# Altium PCB Bento_Pad_Plus_PCB.PcbDoc (part 2 of 3)
Units mm, origin at the board's own origin, x right, y up, seen from the top; angles counter-clockwise.
Board outline 279.4 x 81.28 mm, 2 copper layers (Top Layer, Bottom Layer), stack 1.57 mm thick; 149 components, 65 nets, 541 pads, 199 vias.
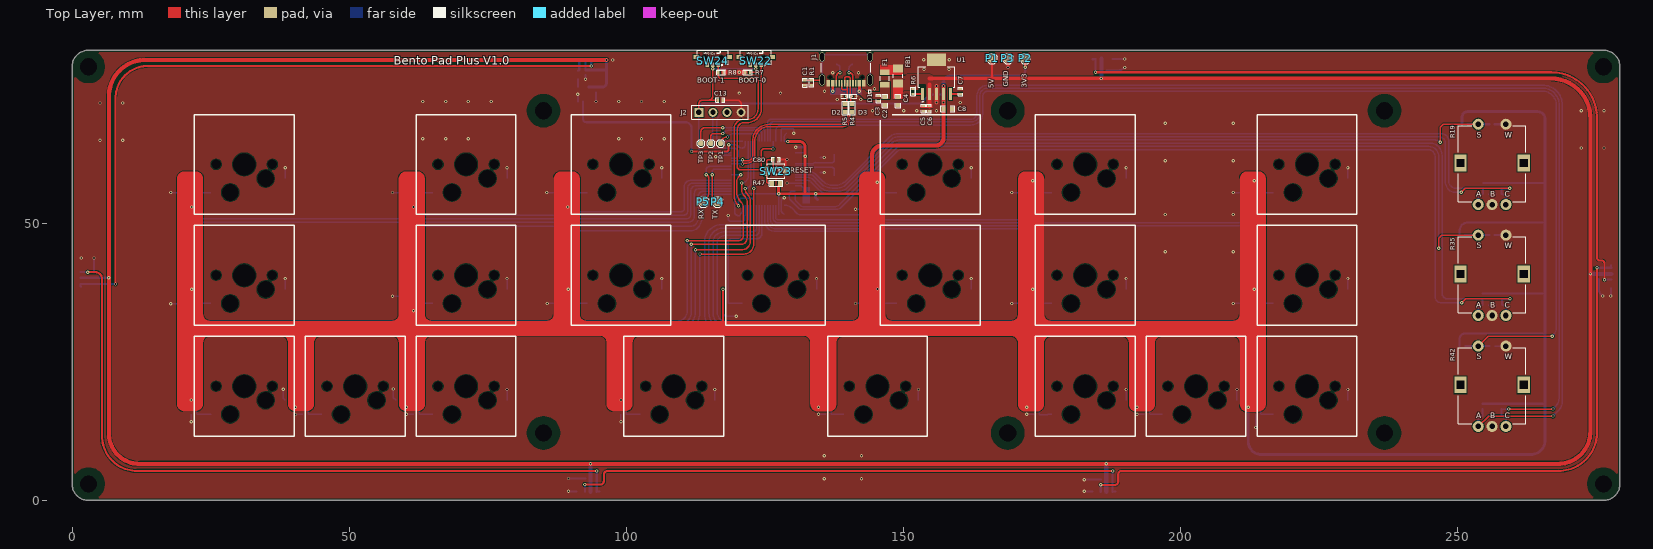
[diagram p0: Top Layer view]

## Part data (continued)
R2 R3: library part RC0402FR-075K1L, "RES 5.1K OHM 1% 1/16W 0402", Case Code (Imperial)=0402, Case Code (Metric)=1005, LCSC Part Number=C105872, Manufacturer=Yageo, Max Operating Temperature=155°C, Max Power Dissipation=63mW, Min Operating Temperature=-55°C, Package Quantity=1, Resistance=5.1kR, Resistance Tolerance=1%, Resistor Type="Thick Film", Temperature Coefficient=100ppm/°C, Voltage Rating=50V, Case/Package=0402, Category="Chip SMD Resistors", ComponentLink1Description=https://datasheet.ciiva.com/7983/1018594-7983519.pdf?src-supplier=Element14, ComponentLink1URL=https://datasheet.ciiva.com/7983/1018594-7983519.pdf?src-supplier=Element14, ComponentLink2Description=https://datasheet.ciiva.com/46394/1018594-46394936.pdf?src-supplier=Element14, ComponentLink2URL=https://datasheet.ciiva.com/46394/1018594-46394936.pdf?src-supplier=Element14, ComponentLink3Description=https://datasheet.ciiva.com/2453/pyu-r-int-thick-7-2453401.pdf?src-supplier=Digi-Key, ComponentLink3URL=https://datasheet.ciiva.com/2453/pyu-r-int-thick-7-2453401.pdf?src-supplier=Digi-Key, ComponentLink4Description=https://datasheet.ciiva.com/2453/pyu-r-int-thick-7-2453402.pdf?src-supplier=Digi-Key, ComponentLink4URL=https://datasheet.ciiva.com/2453/pyu-r-int-thick-7-2453402.pdf?src-supplier=Digi-Key, ComponentLink5Description=https://datasheet.ciiva.com/2453/pyu-r-int-thick-7-2453400.pdf?src-supplier=Digi-Key, ComponentLink5URL=https://datasheet.ciiva.com/2453/pyu-r-int-thick-7-2453400.pdf?src-supplier=Digi-Key, ComponentLink6Description=https://datasheet.ciiva.com/12558/pyu-rc0402-51-rohs-l-6-r-8721-12558460.pdf?src-supplier=Mouser, ComponentLink6URL=https://datasheet.ciiva.com/12558/pyu-rc0402-51-rohs-l-6-r-8721-12558460.pdf?src-supplier=Mouser, ComponentLink7Description=https://datasheet.ciiva.com/16744/pyu-rc0402-51-rohs-l-6-r-16744283.pdf?src-supplier=Future+Electronics, ComponentLink7URL=https://datasheet.ciiva.com/16744/pyu-rc0402-51-rohs-l-6-r-16744283.pdf?src-supplier=Future+Electronics, ComponentLink8Description=https://datasheet.ciiva.com/15189/getdatasheetpartid-323636-15189493.pdf?src-supplier=Verical, ComponentLink8URL=https://datasheet.ciiva.com/15189/getdatasheetpartid-323636-15189493.pdf?src-supplier=Verical, Construction=Rectangular, Depth=0.5mm, Features="Moisture Resistant", Height=0.016inch, Item Type=Resistor, Lead Free="Lead Free", Length=1mm, Manufacturer Part Number=RC0402FR-075K1L, Military Standard=Not, Number of Terminations=2, Packaging="Tape and Reel", Power Rating=63mW, Pricing 1="10000=0.00085 (USD)", RoHS=Yes, RoHS Compliant=Yes, Series=RC, Stock 1=65000, Supplier 1=Avnet, Supplier Part Number 1=RC0402FR-075K1L, Technology="THICK FILM", Termination=SMD/SMT, Tolerance=1%, Voltage Rating (DC)=50V, Width=0.02inch, Working Voltage=50V
R4 R5: library part 0603WAF200JT5E, "100mW Thick Film Resistors ±100ppm/℃ ±1% 20Ω 0603 Chip Resistor - Surface Mount ROHS", LCSC Part no=C22950, Manufacturer="UNI-ROYAL(Uniroyal Elec)", Package=0603, ComponentLink1Description=LCSC, ComponentLink1URL=https://www.lcsc.com/product-detail/Chip-Resistor-Surface-Mount_UNI-ROYAL-Uniroyal-Elec-0603WAF200JT5E_C22950.html, Item Type=Resistor, Manufacturer Part no=0603WAF200JT5E
R6 R7 R8 R9 R10 R11 R12 R13 R14 R15 R16 R17 R18 R20 R21 R22 R23 R24 R25 R26 R27 R28 R29 R30 R31 R32 R33 R34 R36 R37 R40 R41 R43: library part RC0402FR-0710KL, "RES 10K OHM 1% 1/16W 0402", Case Code (Imperial)=0402, Case Code (Metric)=1005, LCSC Part Number=C60490, Manufacturer=Yageo, Max Operating Temperature=155°C, Max Power Dissipation=63mW, Min Operating Temperature=-55°C, Power Rating=62.5mW, Resistance=10kR, Resistance Tolerance=1%, Resistor Type="Thick Film", Supplier Part Number 1=603-RC0402FR-0710KL, Temperature Coefficient=100ppm/°C, Voltage Rating=50V, Case/Package=0402, Category="Chip SMD Resistors", ComponentLink1Description=https://datasheet.ciiva.com/7660/38568-7660787.pdf?src-supplier=Element14, ComponentLink1URL=https://datasheet.ciiva.com/7660/38568-7660787.pdf?src-supplier=Element14, ComponentLink2Description=https://datasheet.ciiva.com/7849/1686128-7849814.pdf?src-supplier=Element14, ComponentLink2URL=https://datasheet.ciiva.com/7849/1686128-7849814.pdf?src-supplier=Element14, ComponentLink3Description=https://datasheet.ciiva.com/7983/1018594-7983486.pdf?src-supplier=Element14, ComponentLink3URL=https://datasheet.ciiva.com/7983/1018594-7983486.pdf?src-supplier=Element14, ComponentLink4Description=https://datasheet.ciiva.com/22747/1018594-22747512.pdf?src-supplier=Element14, ComponentLink4URL=https://datasheet.ciiva.com/22747/1018594-22747512.pdf?src-supplier=Element14, ComponentLink5Description=https://datasheet.ciiva.com/12667/pyu-rc0402-51-rohs-l-6-r-12667067.pdf?src-supplier=Mouser, ComponentLink5URL=https://datasheet.ciiva.com/12667/pyu-rc0402-51-rohs-l-6-r-12667067.pdf?src-supplier=Mouser, ComponentLink6Description=https://datasheet.ciiva.com/7849/1784430-7849813.pdf?src-supplier=Element14, ComponentLink6URL=https://datasheet.ciiva.com/7849/1784430-7849813.pdf?src-supplier=Element14, ComponentLink7Description=https://datasheet.ciiva.com/7849/1784430-7849815.pdf?src-supplier=Element14, ComponentLink7URL=https://datasheet.ciiva.com/7849/1784430-7849815.pdf?src-supplier=Element14, Construction=Rectangular, Depth=0.5mm, Features="Moisture Resistant", Height=0.32mm, Item Type=Resistor, Lead Free="Lead Free", Lead Pitch=0.2mm, Length=1mm, Manufacturer Part Number=RC0402FR-0710KL, Military Standard=Not, Number of Pins=2, Number of Terminations=2, Packaging="Tape and Reel", Pricing 1="1=0.10000, 10=0.01400, 50=0.01400, 100=0.00500, 1000=0.00300, 10000=0.00200 (USD)", REACH SVHC="No SVHC", RoHS=Yes, RoHS Compliant=Yes, Series=RC, Stock 1=18648329, Supplier 1=Mouser, Termination=SMD/SMT, Tolerance=1%, Voltage Rating (DC)=50V, Width=0.5mm, Working Voltage=50V
R19 R35 R42: "11mm Encoder with 24 Detent Force 20mm Metal Flatted Shaft PC Pin Horizontal/Rear Facing", LCSC Part Number=-, Manufacturer=Bourns, Package=Custom, Supplier Part Number=118-PEC11H-4220F-S0024-ND, ComponentLink1Description=Digikey, ComponentLink1URL=https://www.digikey.com/en/products/detail/bourns-inc/PEC11H-4220F-S0024/12349532, Item Type=Encoder, Manufacturer Part Number=PEC11H-4220F-S0024, Pricing="1=3.04, 5=2.746, 10=2.565, 25=2.3516, 75=2.194, 150=2.0646, 300=1.89023, 450=1.77209, 975=1.65958 (USD)", RoHS=No, Stock=1001, Supplier=Digikey
R38: library part RC0402FR-071ML, "RES 1M OHM 1% 1/16W 0402", Case Code (Imperial)=0402, Case Code (Metric)=1005, LCSC Part Number=C138033, Manufacturer=Yageo, Max Operating Temperature=155°C, Max Power Dissipation=63mW, Min Operating Temperature=-55°C, Resistance Tolerance=1%, Resistor Type="Thick Film", Supplier Part Number=311-1.00MLRCT-ND, Temperature Coefficient=100ppm/°C, Voltage Rating=50V, Case/Package=0402, Category="Chip SMD Resistors", ComponentLink1Description=https://datasheet.ciiva.com/11808/0900766b80c66297-11808125.pdf?src-supplier=Rs, ComponentLink1URL=https://datasheet.ciiva.com/11808/0900766b80c66297-11808125.pdf?src-supplier=Rs, ComponentLink2Description=https://datasheet.ciiva.com/46394/1018594-46394951.pdf?src-supplier=Element14, ComponentLink2URL=https://datasheet.ciiva.com/46394/1018594-46394951.pdf?src-supplier=Element14, ComponentLink3Description=https://datasheet.ciiva.com/7849/1018594-7849883.pdf?src-supplier=Element14, ComponentLink3URL=https://datasheet.ciiva.com/7849/1018594-7849883.pdf?src-supplier=Element14, ComponentLink4Description=https://datasheet.ciiva.com/7849/1018594-7849882.pdf?src-supplier=Element14, ComponentLink4URL=https://datasheet.ciiva.com/7849/1018594-7849882.pdf?src-supplier=Element14, ComponentLink5Description=https://datasheet.ciiva.com/16741/pyu-rc0402-51-rohs-l-6-r-16741081.pdf?src-supplier=Future+Electronics, ComponentLink5URL=https://datasheet.ciiva.com/16741/pyu-rc0402-51-rohs-l-6-r-16741081.pdf?src-supplier=Future+Electronics, Construction=Rectangular, Depth=0.5mm, Features="Moisture Resistant", Height=0.32mm, Item Type=Resistor, Lead Free=5697LeadFree, Length=1mm, Manufacturer Part Number=RC0402FR-071ML, Military Standard=Not, Number of Terminations=2, Packaging="Tape and Reel", Power Rating=63mW, Pricing="1=0.1, 10=0.015, 50=0.0088, 100=0.0073, 500=0.00488, 1000=0.00417, 5000=0.00297 (USD)", Reach SVHC Compliant=Unknown, RoHS=Yes, RoHS Compliant=Yes, Series=RC, Stock=6516, Supplier=Digikey, Technology="THICK FILM", Termination=SMD/SMT, Tolerance=1%, Voltage Rating (AC)=50V
R39: library part RC0603FR-07220RL, "RES SMD 220 OHM 1% 1/10W 0603", Case Code (Imperial)=0603, Case Code (Metric)=1608, LCSC Part Number=C107696, Manufacturer=Yageo, Max Operating Temperature=155°C, Max Power Dissipation=100mW, Min Operating Temperature=-55°C, Package Quantity=1, Supplier Part Number 1=311-220HRCT-ND, Temperature Coefficient=100ppm/°C, Tolerance=1%, Voltage Rating=50V, Case/Package=0603, ComponentLink1Description=http://www.yageo.com/documents/recent/PYu-RC_Group_51_RoHS_L_10.pdf?src-supplier=Digi-Key, ComponentLink1URL=http://www.yageo.com/documents/recent/PYu-RC_Group_51_RoHS_L_10.pdf?src-supplier=Digi-Key, ComponentLink2Description=http://www.farnell.com/datasheets/1868787.pdf?src-supplier=Element14, ComponentLink2URL=http://www.farnell.com/datasheets/1868787.pdf?src-supplier=Element14, Composition="Thick Film", Depth=0.8mm, Features="Moisture Resistant", Height=0.022inch, Item Type=Resistor, Lead Free="Lead Free", Length=1.6mm, Manufacturer Part Number=RC0603FR-07220RL, Military Standard=Not, Number of Pins=2, Number of Terminations=2, Packaging="Tape and Reel", Power Rating=100mW, Pricing 1="1=0.1, 10=0.023, 100=0.0094, 1000=0.00421, 2500=0.00366 (USD)", REACH SVHC="No SVHC", Resistance=220R, Stock 1=5843995, Supplier 1=Digi-Key, Termination=SMD/SMT, Voltage Rating (DC)=50V, Width=0.031inch
R47: library part RC0603FR-0710KL, "RES SMD 10K Ohm 1% 1/10W 0603", Case Code (Imperial)=0603, Case Code (Metric)=1608, LCSC Part Number=C98220, Manufacturer=Yageo, Max Operating Temperature=155°C, Max Power Dissipation=100mW, Min Operating Temperature=-55°C, Resistance=10kR, Resistance Tolerance=1%, Resistor Type="Thick Film", Supplier Part Number 1=311-10.0KHRCT-ND, Temperature Coefficient=100ppm/°C, Voltage Rating=75V, Voltage Rating (DC)=50V, Case/Package=0603, Category="Chip SMD Resistors", ComponentLink1Description=https://datasheet.ciiva.com/7660/38590-7660789.pdf?src-supplier=Element14, ComponentLink1URL=https://datasheet.ciiva.com/7660/38590-7660789.pdf?src-supplier=Element14, ComponentLink2Description=https://datasheet.ciiva.com/7983/443971-7983596.pdf?src-supplier=Element14, ComponentLink2URL=https://datasheet.ciiva.com/7983/443971-7983596.pdf?src-supplier=Element14, ComponentLink3Description=https://datasheet.ciiva.com/22747/443971-22747519.pdf?src-supplier=Element14, ComponentLink3URL=https://datasheet.ciiva.com/22747/443971-22747519.pdf?src-supplier=Element14, ComponentLink4Description=https://datasheet.ciiva.com/46440/1868787-46440891.pdf?src-supplier=Element14, ComponentLink4URL=https://datasheet.ciiva.com/46440/1868787-46440891.pdf?src-supplier=Element14, ComponentLink5Description=https://datasheet.ciiva.com/7746/1738695-7746239.pdf?src-supplier=Element14, ComponentLink5URL=https://datasheet.ciiva.com/7746/1738695-7746239.pdf?src-supplier=Element14, ComponentLink6Description=https://datasheet.ciiva.com/15189/getdatasheetpartid-409289-15189591.pdf?src-supplier=Verical, ComponentLink6URL=https://datasheet.ciiva.com/15189/getdatasheetpartid-409289-15189591.pdf?src-supplier=Verical, Construction=Rectangular, Depth=0.8mm, Features="Moisture Resistant", Height=0.45mm, Item Type=Resistor, Lead Free="Lead Free", Lead Pitch=0.3mm, Length=1.6mm, Manufacturer Part Number=RC0603FR-0710KL, Military Standard=Not, Number of Pins=2, Number of Terminations=2, Packaging="Tape and Reel", Power Rating=100mW, Pricing 1="1=0.10000, 10=0.02400, 100=0.00970, 1000=0.00436, 2500=0.00378 (USD)", REACH SVHC=Unknown, RoHS=Yes, RoHS Compliant=Yes, Series=RC, Size Code=0603, Stock 1=25249139, Supplier 1=Digi-Key, Termination=SMD/SMT, Tolerance=1%, Weight=7.1E-05oz, Width=0.8mm
SW1 SW2 SW3 SW4 SW5 SW6 SW7 SW8 SW9 SW10 SW11 SW12 SW13 SW14 SW15 SW16 SW17 SW18 SW19 SW20 SW21: "SMD,14.5x5.9mm Mechanical Keyboard Shaft ROHS", LCSC Part Number=C41430893, Manufacturer=HanElectricity, Package=SMD,14.5x5.9mm, ComponentLink1Description=LCSC, ComponentLink1URL=https://www.lcsc.com/product-detail/Mechanical-Keyboard-Shaft_HanElectricity-CPG151101S11-16_C41430893.html?s_z=n_%2520CPG151101S11-16, Item Type="Mechanical Keyboard Shaft", Manufacturer Part Number=CPG151101S11-16
SW22 SW24: "Surface Mount 1A SPDT 6V Black 10000次 SMD Slide Switches ROHS", LCSC Part Number=C778185, Manufacturer=G-Switch, Package=SMD, ComponentLink1Description=LCSC, ComponentLink1URL=https://www.lcsc.com/product-detail/Slide-Switches_G-Switch-MK-11C04-G013_C778185.html, Item Type="Slide Switche", Manufacturer Part Number=MK-11C04-G013
SW23: "SWITCH TACTILE SPST-NO 0.05A 12V", Contact Current Rating=50mA, Contact Resistance=100mR, Insulation Resistance=100MR, LCSC Part Number=C231329, Manufacturer=Omron, Max Operating Temperature=70°C, Max Voltage Rating (DC)=12V, Min Operating Temperature=-25°C, Operating Force=1.5N, Package Quantity=1, Ratings="Dust Proof,IP40", Supplier Part Number 1=SW1020DKR-ND, Actuator Length=0.4mm, Actuator Type=Standard, ComponentLink1Description=http://www.farnell.com/datasheets/60838.pdf?src-supplier=Farnell, ComponentLink1URL=http://www.farnell.com/datasheets/60838.pdf?src-supplier=Farnell, ComponentLink2Description=http://www.farnell.com/datasheets/60838.pdf?src-supplier=Element14, ComponentLink2URL=http://www.farnell.com/datasheets/60838.pdf?src-supplier=Element14, ComponentLink3Description=https://omronfs.omron.com/en_US/ecb/products/pdf/en-b3u.pdf?src-supplier=Digi-Key, ComponentLink3URL=https://omronfs.omron.com/en_US/ecb/products/pdf/en-b3u.pdf?src-supplier=Digi-Key, ComponentLink4Description=http://www.omron.com/ecb/products/pdf/en-b3u.pdf?src-supplier=Digi-Key, ComponentLink4URL=http://www.omron.com/ecb/products/pdf/en-b3u.pdf?src-supplier=Digi-Key, ComponentLink5Description=https://www.distrelec.biz/Web/Downloads/he/et/B3U_eng_datasheet.pdf?mime=application%2Fpdf&src-supplier=Distrelec, ComponentLink5URL=https://www.distrelec.biz/Web/Downloads/he/et/B3U_eng_datasheet.pdf?mime=application%2Fpdf&src-supplier=Distrelec, ComponentLink6Description=http://www.onlinecomponents.com/productFiles/mf-OM/en-b3u.pdf?src-supplier=Onlinecomponents.com, ComponentLink6URL=http://www.onlinecomponents.com/productFiles/mf-OM/en-b3u.pdf?src-supplier=Onlinecomponents.com, ComponentLink7Description=https://www.verical.com/server-webapp/html/getDatasheet?partID=552554&src-supplier=Verical, ComponentLink7URL=https://www.verical.com/server-webapp/html/getDatasheet?partID=552554&src-supplier=Verical, ComponentLink8Description=http://www.farnell.com/datasheets/1685550.pdf?src-supplier=Element14, ComponentLink8URL=http://www.farnell.com/datasheets/1685550.pdf?src-supplier=Element14, ComponentLink9Description=http://www.farnell.com/datasheets/2610940.pdf?src-supplier=Farnell, ComponentLink9URL=http://www.farnell.com/datasheets/2610940.pdf?src-supplier=Farnell, ComponentLink10Description=https://www.alliedelec.com/m/d/4c8a9ef82804fc3c241a13c1e298fd73.pdf?src-supplier=Allied+Electronics, ComponentLink10URL=https://www.alliedelec.com/m/d/4c8a9ef82804fc3c241a13c1e298fd73.pdf?src-supplier=Allied+Electronics, Contact Material=Silver, Current Rating=50mA, Depth=2.5mm, Electrical Life=200000Cycles, Height=1.2mm, Illumination Type=Non-Illuminated,Illuminated, Item Type=Switch, Lead Free="Lead Free", Length=4mm, Manufacturer Part Number=B3U-1000P, Max Current Rating=50mA, Mechanical Life=200000Cycles, Mount="Surface Mount", Orientation=Straight, Packaging="Tape and Reel", Pricing 1="1=1, 10=0.961, 25=0.9064, 50=0.7976, 100=0.7251, 250=0.68888, 500=0.67074, 1000=0.52571 (USD)", REACH SVHC=Unknown, Stock 1=116454, Supplier 1=Digi-Key, Switch Function=Off-Mom, Switch Travel=0.15mm, Termination=SMD/SMT, Throw Configuration=SPST, Voltage Rating (DC)=12V, Weight=0.000776oz, Width=3mm
U1: "IC REG LINEAR 3.3V 1A SOT223-6", LCSC Part Number=C485803, Manufacturer="Texas Instruments", Supplier Part Number=595-TPS79633DCQR, Category="Voltage Regulators - Linear", ComponentLink1Description=https://datasheet.ciiva.com/2045/tps79601-2045264.pdf?src-supplier=Digi-Key, ComponentLink1URL=https://datasheet.ciiva.com/2045/tps79601-2045264.pdf?src-supplier=Digi-Key, ComponentLink2Description=https://datasheet.ciiva.com/22704/1846966-22704703.pdf?src-supplier=Element14, ComponentLink2URL=https://datasheet.ciiva.com/22704/1846966-22704703.pdf?src-supplier=Element14, ComponentLink3Description=https://datasheet.ciiva.com/41462/001015136-da-01-en-ic-reg-ldo-3-3v-1-tps79633dcqr-sot-6-tid-41462982.pdf?src-supplier=Conrad, ComponentLink3URL=https://datasheet.ciiva.com/41462/001015136-da-01-en-ic-reg-ldo-3-3v-1-tps79633dcqr-sot-6-tid-41462982.pdf?src-supplier=Conrad, Item Type=IC, Length=6.5mm, Manufacturer Part Number=TPS79633DCQR, Pricing="1=3.24, 10=2.75, 50=2.75, 100=2.39, 1000=1.72, 10000=1.56 (USD)", RoHS=Yes, Stock=3089, Supplier=Mouser, Thickness=1.6mm, Width=3.5mm
U2: "IC BUF NON-INVERT 5.5V SOT23-5", Case/Package=SOT-23-5, High Level Output Current=-8mA, LCSC Part Number=C100024, Low Level Output Current=8mA, Manufacturer="Texas Instruments", Max Operating Temperature=125°C, Max Supply Voltage=5.5V, Min Operating Temperature=-40°C, Min Supply Voltage=1.6V, Package Quantity=3000, Quiescent Current=1uA, Supplier Part Number 1=296-37176-6-ND, ComponentLink1Description=http://www.ti.com/lit/pdf/sdyu001?src-supplier=Digi-Key, ComponentLink1URL=http://www.ti.com/lit/pdf/sdyu001?src-supplier=Digi-Key, ComponentLink2Description=http://www.ti.com/lit/ds/symlink/sn74lv1t34.pdf?src-supplier=Avnet, ComponentLink2URL=http://www.ti.com/lit/ds/symlink/sn74lv1t34.pdf?src-supplier=Avnet, Item Type=IC, Lead Free="Lead Free", Logic Function=Buffer,Inverting, Manufacturer Part Number=SN74LV1T34DBVR, Mount="Surface Mount", Number of Bits=1, Number of Bits per Element=1, Number of Channels=1, Number of Elements=1, Number of Input Lines=1, Number of Inputs=1, Number of Output Lines=1, Number of Outputs=1, Number of Pins=5, Operating Supply Current=8mA, Packaging="Tape and Reel", Polarity=Non-Inverting, Pricing 1="1=0.43, 10=0.349, 25=0.3192, 100=0.2374, 250=0.2152, 500=0.17808, 1000=0.13356 (USD)", Propagation Delay=15.5ns, Radiation Hardening=No, REACH SVHC="No SVHC", RoHS Compliant=Yes, Stock 1=37360, Supplier 1=Digi-Key, Weight=0.000353oz
U4: "IC MCU 32BIT 256KB FLASH 64LQFP", Case/Package=LQFP, Clock Frequency=72MHz, LCSC Part Number=C8323, Manufacturer=STMicroelectronics, Max Operating Temperature=85°C, Max Supply Voltage=3.6V, Min Operating Temperature=-40°C, Min Supply Voltage=2V, Package Quantity=960, Supplier Part Number 1=511-STM32F103RCT6, Category=Microcontrollers, ComponentLink1Description=https://datasheet.ciiva.com/4845/cd00191185-4845648.pdf?src-supplier=Mouser, ComponentLink1URL=https://datasheet.ciiva.com/4845/cd00191185-4845648.pdf?src-supplier=Mouser, ComponentLink2Description=https://datasheet.ciiva.com/8054/1831497-8054949.pdf?src-supplier=Element14, ComponentLink2URL=https://datasheet.ciiva.com/8054/1831497-8054949.pdf?src-supplier=Element14, ComponentLink3Description=https://datasheet.ciiva.com/5752/cd00191185-5752853.pdf?src-supplier=Farnell, ComponentLink3URL=https://datasheet.ciiva.com/5752/cd00191185-5752853.pdf?src-supplier=Farnell, ComponentLink4Description=https://datasheet.ciiva.com/9224/cd00191185-9224408.pdf?src-supplier=Avnet, ComponentLink4URL=https://datasheet.ciiva.com/9224/cd00191185-9224408.pdf?src-supplier=Avnet, ComponentLink5Description=https://datasheet.ciiva.com/16382/cd00191185-16382444.pdf?src-supplier=Future+Electronics, ComponentLink5URL=https://datasheet.ciiva.com/16382/cd00191185-16382444.pdf?src-supplier=Future+Electronics, Core Architecture=ARM, Data Bus Width=32b, Height=1.4mm, Interface=I2C,SPI,USB,CAN,USART, Item Type=IC, Lead Free="Lead Free", Length=10mm, Manufacturer Part Number=STM32F103RCT6, Memory Format=FLASH, Memory Size=256KB, Number of ADC Channels=16, Number of I/Os=51, Number of Timers/Counters=8, Packaging=Tray, Pins=64, Pricing 1="1=9.74000, 10=8.79000, 50=8.38000, 100=7.28000, 1000=5.58000, 10000=5.58000 (USD)", RAM Size=48KB, RoHS=Yes, RoHS Compliant=Yes, Series=STM32F103RC, Stock 1=44788, Supplier 1=Mouser, Weight=0.012088oz, Width=10mm
X1: library part 0153G2-8.000F20DTNJL, "8MHz Surface Mount Crystal 20pF ±10ppm ±30ppm SMD5032 Crystals ROHS", LCSC Part Number=C19270155, Manufacturer=HCI, Package=SMD5032, ComponentLink1Description=LCSC, ComponentLink1URL=https://www.lcsc.com/product-detail/Crystals_HCI-0153G2-8-000F20DTNJL_C19270155.html, Item Type=Crystal, Manufacturer Part Number=0153G2-8.000F20DTNJL

## Free pads (board coordinates)
  round 0 hole 3.1 unplated paste-2539.97 mask+0.051: MH(2.997,78.283) MH(2.997,2.997) MH(85.108,70.358) MH(85.108,12.192) MH(168.892,12.192) MH(168.892,70.358) MH(236.888,70.358) MH(236.888,12.192) MH(276.403,2.997) MH(276.403,78.283)

## Via types
v1: diameter 0.6, hole 0.3, Top Layer to Bottom Layer, tented both sides, 199 vias

## Nets (pads, with @x,y where several pads share a name; then routed paths per layer and width w, separated by ;. In a path a pad name is that pad's centre, name@x,y a point inside that pad or via, vN(x,y) a via of type N, cw(c..) or ccw(c..) an arc to the next point about the centre after c; other vN are vias at no path point)
3V3: C8.2 C13.2 C17.1 C18.1 C51.1 C53.1 C54.1 FB2.2 J2.1 P2.1 R9.1 R10.1 R11.1 R12.1 R13.1 R14.1 R15.2 R16.2 R17.1 R18.1 R20.2 R21.1 R22.1 R23.1 R24.1 R25.1 R26.1 R27.1 R28.1 R29.1 R30.1 R31.1 R32.1 R33.2 R34.2 R36.2 R37.1 R40.2 R41.2 R43.2 R47.1 SW22.C SW24.C U1.4 U4.1 U4.19 U4.32 U4.48 U4.64 | length 428
  Top Layer w0.254: J2.1@113.143,70.053 113.143,71.602 cw(c113.803,71.602) 113.803,72.263 114.883,72.263 ; SW24.C@115.669,78.654 115.669,73.049 cw(c114.883,73.049) 114.883,72.263 ; C13.2@116.522,72.263 114.883,72.263 ; v1(123.417,77.953) SW22.C@123.417,78.654
  Top Layer w0.381: 117.5,30.76 v1(117.5,38.154)
  Top Layer w0.508: R47.1@127.817,57.252 ccw(c128.502,56.566) 127.533,56.566 v1(127.533,55.348) 132.327,55.348 ; v1(129.201,64.801) 131.279,64.801 cw(c131.279,63.754) 132.327,63.754 v1(132.327,62.151) 132.327,55.348 ; 144.374,55.35 144.374,55.348 v1(134.219,55.348) 132.327,55.348 ; v1(172.06,78.207) P2.1@172.06,79.781
  Top Layer w0.762: 144.374,55.348 144.374,54.737 ccw(c144.755,54.737) 144.755,54.356 ; 144.374,55.35 144.374,62.179 cw(c146.253,62.179) 146.253,64.059 155.905,64.059 ccw(c155.905,65.456) 157.302,65.456 C8.2@157.302,70.677 v1(157.302,71.847) U1.4@157.302,73.354 v1(157.302,74.803)
  Bottom Layer w0.254: J2.1@113.143,70.053 113.143,63.586 ccw(c113.753,63.586) 113.753,62.976 C54.1@117.087,62.976 ccw(c117.507,63.396) 117.507,62.801 U4.48@119.033,62.801 ; v1(115.669,77.953) v1(123.417,77.953) ; U4.32@121.033,53.301 121.037,52.828 121.033,52.476 cw(c119.5,52.67) 120.605,51.59 C53.1@120.503,51.431 120.187,51.431 cw(c120.187,51.986) 119.633,51.986 119.633,53.909 cw(c121.071,53.909) 121.071,55.348 v1(127.533,55.348) U4.19@127.533,53.301 127.533,51.62 ccw(c127.591,51.62) C18.1@127.591,51.562 ; C51.1@128.973,66.29 128.845,66.163 ccw(c129.6,65.408) 128.533,65.408 U4.64@128.533,64.801 v1(129.201,64.801) ; U4.1@130.533,62.801 C17.1@132.317,62.801 ; v1(132.327,62.151) C17.1@132.327,62.811
  Bottom Layer w0.381: R13.1@21.539,16.815 v1(21.539,18.134) ; R12.1@21.589,36.835 v1(21.589,38.154) ; v1(21.589,52.986) R11.1@21.589,54.305 ; v1(40.337,16.805) R14.1@41.656,16.805 ; v1(60.378,16.815) R9.1@61.697,16.815 ; v1(61.62,34.241) R17.1@61.62,35.56 ; v1(61.62,52.986) R10.1@61.62,54.305 ; v1(89.459,52.986) R18.1@89.459,54.305 ; R21.1@89.56,36.835 v1(89.56,38.154) ; R22.1@99.085,16.815 v1(99.085,18.134) ; J2.1@113.143,70.053 113.143,70.801 cw(c113.97,70.801) 113.97,71.628 152.479,71.628 ccw(c152.479,73.276) 153.645,72.111 154.283,72.749 cw(c155.501,71.531) 155.501,73.254 157.231,73.254 ccw(c157.231,73.325) 157.302,73.325 ; R28.1@117.5,36.835 v1(117.5,38.154) ; v1(134.749,16.815) R29.1@136.068,16.815 ; R25.1@145.313,56.622 v1(145.313,57.455) ; R30.1@145.389,36.848 v1(145.389,38.167) ; 157.302,75.438 cw(c158.543,75.438) 158.543,76.679 171.1,76.679 ccw(c171.1,77.639) 172.06,77.639 v1(172.06,78.207) ; v1(172.316,16.815) R24.1@173.634,16.815 ; R26.1@173.38,36.835 v1(173.38,38.154) ; R23.1@173.417,56.855 v1(173.417,57.739) ; v1(192.229,16.805) R31.1@193.548,16.805 ; v1(212.321,16.805) R32.1@213.639,16.805 ; R37.1@213.411,36.735 v1(213.411,38.154) ; R27.1@213.411,56.855 v1(213.411,57.739) ; R43.2@250.469,27.868 250.469,29.159 cw(c251.46,29.159) 251.46,30.15 265.841,30.15 ccw(c265.841,30.196) 265.887,30.196 265.887,30.15 ; R36.2@250.469,47.888 250.469,48.735 cw(c251.904,48.735) 251.904,50.17 265.887,50.17 ; R41.2@254.571,17.45 R40.2@258.051,17.45 265.887,17.45 ; R34.2@254.597,37.338 R33.2@258.077,37.338 265.859,37.338 ccw(c265.859,37.366) 265.887,37.366 265.887,37.338 ; R16.2@254.648,57.282 R15.2@258.051,57.282 265.887,57.282
  Bottom Layer w0.508: v1(134.219,55.348) 134.219,54.625 FB2.2@134.564,54.28 ; v1(212.321,16.805) 212.321,10.615 ccw(c214.63,10.615) 214.63,8.306 263.347,8.306 ccw(c263.347,10.846) 265.887,10.846 265.887,17.45 265.887,30.15 ; R20.2@250.914,67.908 250.914,69.253 cw(c251.851,69.253) 251.851,70.19 264.554,70.19 cw(c264.554,68.857) 265.887,68.857 265.887,57.282 265.887,50.17 265.887,37.366 ; 265.887,30.196 265.887,37.338
  Bottom Layer w0.762: v1(157.302,71.847) 157.302,73.325 v1(157.302,74.803) 157.302,75.438
3V3#: C57.1 FB2.1 U4.13 | length 1.9
  Bottom Layer w0.254: U4.13@130.533,56.801 131.395,56.801 cw(c131.395,56.163) 131.846,56.614 132.073,56.388 C57.1@132.327,56.388
5V: C4.2 C5.2 C6.2 C9.2 C10.2 C11.2 C12.2 C14.2 C49.2 C50.2 FB1.2 LED1.2 LED2.2 LED3.2 LED4.2 LED5.2 LED6.2 P1.1 R6.2 U1.2 U2.5 | length 652.9
  Top Layer w0.508: 165.994,76.176 ccw(c165.994,76.247) 166.065,76.247 P1.1@166.065,79.781
  Top Layer w0.762: v1(6.655,40.19) 6.655,12.101 ccw(c12.151,12.101) 12.151,6.604 v1(93.574,6.604) 268.213,6.604 ccw(c268.213,12.457) 274.066,12.457 274.066,69.024 ccw(c266.914,69.024) 266.914,76.176 165.994,76.176 154.767,76.176 154.765,76.175 ; v1@6.667,40.19 6.667,73.015 cw(c13.154,73.015) 13.154,79.502 v1(96.469,79.502) ; 154.227,71.187 154.745,71.187 154.762,71.204 154.762,75.082 ; C6.2@154.765,71.158 C6.2@154.765,71.223
  Bottom Layer w0.381: C10.2@92.683,77.699 LED1.2@92.683,79.718
  Bottom Layer w0.508: LED2.2@1.562,40.19 C11.2@3.968,40.19 v1(6.655,40.19) ; C10.2@92.683,77.699 95.936,77.699 ccw(c95.936,78.232) 96.469,78.232 ; U2.5@93.204,74.608 C9.2@94.569,74.608 95.674,74.608 ccw(c95.674,75.403) 96.469,75.403 96.469,78.232 ; v1(96.469,79.502) 96.469,78.232
  Bottom Layer w0.762: v1(93.574,6.604) 93.583,6.604 LED3.2@93.583,1.562 ; v1(185.801,76.175) LED6.2@185.802,79.718 ; LED4.2@186.702,1.562 186.69,1.562 C14.2@186.69,3.759 186.69,6.629 v1(186.702,6.629) ; v1(274.066,40.894) 274.066,40.889 LED5.2@277.838,40.889
BOOT_0: R7.1 SW22.1 U4.60 | length 35
  Top Layer w0.254: R7.1@122.417,77.292 123.717,77.292 ccw(c123.717,77.992) 124.417,77.992 ; SW22.1@124.417,78.654 124.417,70.739 cw(c121.877,70.739) 121.877,68.199 121.329,68.199 ccw(c121.329,66.938) 120.067,66.938 120.067,60.251 ccw(c120.628,60.251) 120.628,59.69 123.901,59.69 ccw(c123.901,60.223) 124.435,60.223 124.435,63.062 cw(c124.821,63.062) 124.821,63.449 v1(126.533,63.449)
  Bottom Layer w0.254: v1(126.533,63.449) U4.60@126.533,64.801
BOOT_1: R8.2 SW24.1 U4.28 | length 40.3
  Top Layer w0.254: SW24.1@116.669,78.654 116.669,76.645 ccw(c117.114,76.645) 117.114,76.2 123.263,76.2 cw(c123.263,75.638) 123.825,75.638 123.825,70.619 cw(c121.989,70.619) 121.989,68.783 121.218,68.783 ccw(c121.218,67.072) 119.507,67.072 ; 119.507,67.285 119.507,67.072 ; v1(120.283,53.218) 120.251,53.25 cw(c122.047,55.046) 119.507,55.046 119.507,67.072
  Bottom Layer w0.254: v1(120.283,53.218) 120.283,53.893 cw(c120.973,53.893) 120.973,54.583 122.613,54.583 cw(c122.613,54.164) 123.033,54.164 U4.28@123.033,53.301
D+: D2.1 J1.A6 J1.B6 R5.1 | length 6.3
  Top Layer w0.254: J1.B6@138.958,75.324 138.958,74.363 ccw(c139.231,74.363) 139.231,74.09 139.657,74.09 ccw(c139.657,74.392) 139.958,74.392 ; R5.1@139.587,71.603 139.624,71.603 139.878,71.857 139.878,72.76 139.742,72.896 139.742,72.941 D2.1@139.734,72.949 ; D2.1@139.689,72.949 D2.1@139.734,72.949 ; J1.A6@139.958,75.324 139.958,74.392 ; D2.1@139.734,72.949 139.958,73.173 139.958,74.392
D-: D3.1 J1.A7 J1.B7 R4.1 | length 7.1
  Top Layer w0.254: J1.A7@139.458,75.324 139.458,76.168 cw(c139.734,76.168) 139.734,76.444 140.154,76.444 cw(c140.154,76.139) 140.458,76.139 J1.B7@140.458,75.324 140.458,73.216 D3.1@140.725,72.949 ; D3.1@140.77,72.949 D3.1@140.725,72.949 ; R4.1@140.811,71.603 140.797,71.603 140.543,71.857 140.543,72.721 140.717,72.896 140.717,72.941 D3.1@140.725,72.949
ENC1_CHA: C19.2 R16.1 R19.A U4.8 | length 140.9
  Bottom Layer w0.254: U4.8@130.533,59.301 133.402,59.301 cw(c133.402,58.272) 134.13,59 135.54,57.59 135.542,57.588 ccw(c137.152,59.199) 137.152,56.921 ; 137.153,56.921 137.968,56.921 ; 137.969,56.921 ccw(c137.969,59.137) 139.537,57.571 147.599,65.634 cw(c148.887,64.346) 148.887,66.167 247.29,66.167 ; 247.421,66.167 247.29,66.167 ; R16.1@254.648,56.342 249.872,56.342 cw(c249.872,57.751) 248.463,57.751 248.463,64.994 ccw(c247.29,64.994) 247.29,66.167
  Bottom Layer w0.381: R19.A@253.819,53.408 253.819,54.472 cw(c254.648,54.472) C19.2@254.648,55.301 R16.1@254.648,56.342
ENC1_CHB: C21.2 R15.1 R19.B U4.9 | length 147.4
  Top Layer w0.254: v1(250.723,55.616) 251.449,56.342 v1(259.526,56.342)
  Bottom Layer w0.254: U4.9@130.533,58.801 133.294,58.801 cw(c133.294,58.067) 133.813,58.586 135.203,57.196 135.204,57.195 ccw(c137.152,59.142) 137.152,56.388 ; 137.153,56.388 138.193,56.388 138.195,56.388 ccw(c138.195,58.593) 139.755,57.035 147.832,65.112 cw(c149.091,63.853) 149.091,65.634 246.759,65.634 cw(c246.759,64.514) 247.879,64.514 247.879,57.487 ccw(c249.75,57.487) 249.75,55.616 v1(250.723,55.616)
  Bottom Layer w0.381: R19.B@258.819,53.408 258.819,54.533 ccw(c258.051,54.533) C21.2@258.051,55.301 R15.1@258.051,56.342 v1(259.526,56.342)
ENC2_CHA: C22.2 R34.1 R35.A U4.11 | length 158.7
  Bottom Layer w0.254: U4.11@130.533,57.801 132.644,57.801 cw(c132.644,56.69) 133.43,57.476 134.717,56.188 134.719,56.187 ccw(c136.809,58.278) 136.809,55.321 ; 136.81,55.321 138.582,55.321 ; 138.583,55.321 ccw(c138.583,57.655) 140.234,56.005 148.207,63.978 cw(c149.5,62.686) 149.5,64.514 245.093,64.514 cw(c245.093,62.317) 247.29,62.317 247.29,37.395 ccw(c248.287,37.395) 248.287,36.398 R34.1@254.597,36.398
  Bottom Layer w0.381: R35.A@253.819,33.388 253.819,34.554 cw(c254.597,34.554) C22.2@254.597,35.331 R34.1@254.597,36.398
ENC2_CHB: C24.2 R33.1 R35.B U4.15 | length 169.2
  Top Layer w0.254: v1(250.836,35.687) 251.547,36.398 v1(259.552,36.398)
  Bottom Layer w0.254: U4.15@130.533,55.801 129.967,55.801 ccw(c129.967,55.301) 129.467,55.301 129.467,54.765 ccw(c130.319,54.765) 129.716,54.163 131.133,52.747 ccw(c131.62,53.234) 131.62,52.545 137.989,52.545 ccw(c137.989,53.654) 138.773,52.87 148.837,62.934 cw(c149.835,61.936) 149.835,63.348 244.768,63.348 cw(c244.768,62.098) 246.018,62.098 246.018,36.816 ccw(c247.147,36.816) 247.147,35.687 v1(250.836,35.687)
  Bottom Layer w0.381: R35.B@258.819,33.388 258.819,34.589 ccw(c258.077,34.589) C24.2@258.077,35.331 R33.1@258.077,36.398 v1(259.552,36.398)
ENC3_CHA: C31.2 R41.1 R42.A U4.58 | length 228.7
  Top Layer w0.254: R42.A@253.819,13.368 255.692,15.24 v1(267.31,15.24)
  Bottom Layer w0.254: U4.58@125.533,64.801 125.533,68.154 cw(c126.211,68.154) 126.211,68.832 162.279,68.832 ccw(c162.279,69.875) 163.322,69.875 163.322,72.976 cw(c165.303,72.976) 165.303,74.957 265.477,74.957 cw(c265.477,71.446) 268.988,71.446 ; v1(267.31,15.24) 268.244,16.174 ccw(c266.448,17.97) 268.988,17.97 268.988,71.293 ccw(c265.717,71.293) 268.984,71.446
  Bottom Layer w0.381: R42.A@253.819,13.368 253.819,14.538 cw(c254.571,14.538) C31.2@254.571,15.291 R41.1@254.571,16.51
ENC3_CHB: C33.2 R40.1 R42.B U4.59 | length 220.5
  Top Layer w0.254: v1(259.309,16.51) v1(267.31,16.51)
  Bottom Layer w0.254: U4.59@126.033,64.801 126.033,67.809 cw(c126.548,67.809) 126.548,68.324 162.279,68.324 ccw(c162.279,69.875) 163.83,69.875 163.83,72.976 cw(c165.303,72.976) 165.303,74.449 265.391,74.449 cw(c265.391,71.401) 268.439,71.401 268.439,71.288 ; R40.1@258.051,16.51 v1(259.309,16.51) ; v1(267.31,16.51) 267.695,16.896 ccw(c265.899,18.692) 268.439,18.692 268.439,71.131 ccw(c265.374,71.131) 268.427,71.4
  Bottom Layer w0.381: R40.1@258.051,16.51 C33.2@258.051,15.291 cw(c258.051,14.523) 258.819,14.523 R42.B@258.819,13.368
ENC_BUTTON1: C20.2 R19.S R20.1 U4.10 | length 134.8
  Top Layer w0.254: v1(246.957,64.679) 246.957,67.372 247.493,67.908 R19.S@253.819,67.908
  Bottom Layer w0.254: U4.10@130.533,58.301 132.921,58.301 cw(c132.921,57.391) 133.564,58.035 134.976,56.623 134.977,56.622 ccw(c136.891,58.536) 136.891,55.829 ; 136.892,55.829 138.363,55.829 ; 138.364,55.829 ccw(c138.364,58.185) 140.03,56.52 148.077,64.567 cw(c149.304,63.34) 149.304,65.075 246.018,65.075 cw(c246.018,63.763) 246.945,64.691 v1(246.957,64.679)
  Bottom Layer w0.381: R20.1@251.854,67.908 R19.S@253.819,67.908 C20.2@255.849,67.908
ENC_BUTTON2: C23.2 R35.S R36.1 U4.16 | length 153.3
  Top Layer w0.254: v1(246.683,45.508) 246.683,47.369 247.201,47.888 R35.S@253.819,47.888
  Bottom Layer w0.254: U4.16@130.533,55.301 130.533,54.534 ccw(c131.428,54.534) 130.795,53.901 131.447,53.249 ccw(c131.964,53.767) 131.964,53.035 137.649,53.035 ccw(c137.649,54.386) 138.604,53.431 148.545,63.372 cw(c149.835,62.082) 149.835,63.906 244.921,63.906 cw(c244.921,62.144) 246.683,62.144 v1(246.683,45.508)
  Bottom Layer w0.381: R36.1@251.409,47.888 R35.S@253.819,47.888 C23.2@255.849,47.888
ENC_BUTTON3: C32.2 R42.S R43.1 U4.61 | length 210.1
  Top Layer w0.254: R42.S@253.819,27.868 255.614,29.662 v1(267.183,29.662)
  Bottom Layer w0.254: U4.61@127.033,64.801 127.033,66.785 cw(c128.012,66.785) 128.012,67.763 162.279,67.763 ccw(c162.279,69.875) 164.391,69.875 164.391,72.976 cw(c165.303,72.976) 165.303,73.889 265.379,73.889 cw(c265.379,71.349) 267.919,71.349 267.919,71.292 267.919,71.29 267.919,31.305 cw(c265.731,31.305) 267.278,29.758 v1(267.183,29.662)
  Bottom Layer w0.381: R43.1@251.409,27.868 R42.S@253.819,27.868 C32.2@255.849,27.868